# Altium PCB Telephone Circuit v1.0.PcbDoc (part 2 of 5)
Units mil, origin at the board's own origin, x right, y up, seen from the top; angles counter-clockwise.
Board outline 3149.61 x 2952.76 mil, 2 copper layers (Top Layer, Bottom Layer), stack 61.855 mil thick; 194 components, 119 nets, 557 pads, 213 vias.
Unrouted connection lines stored in the file: 77.
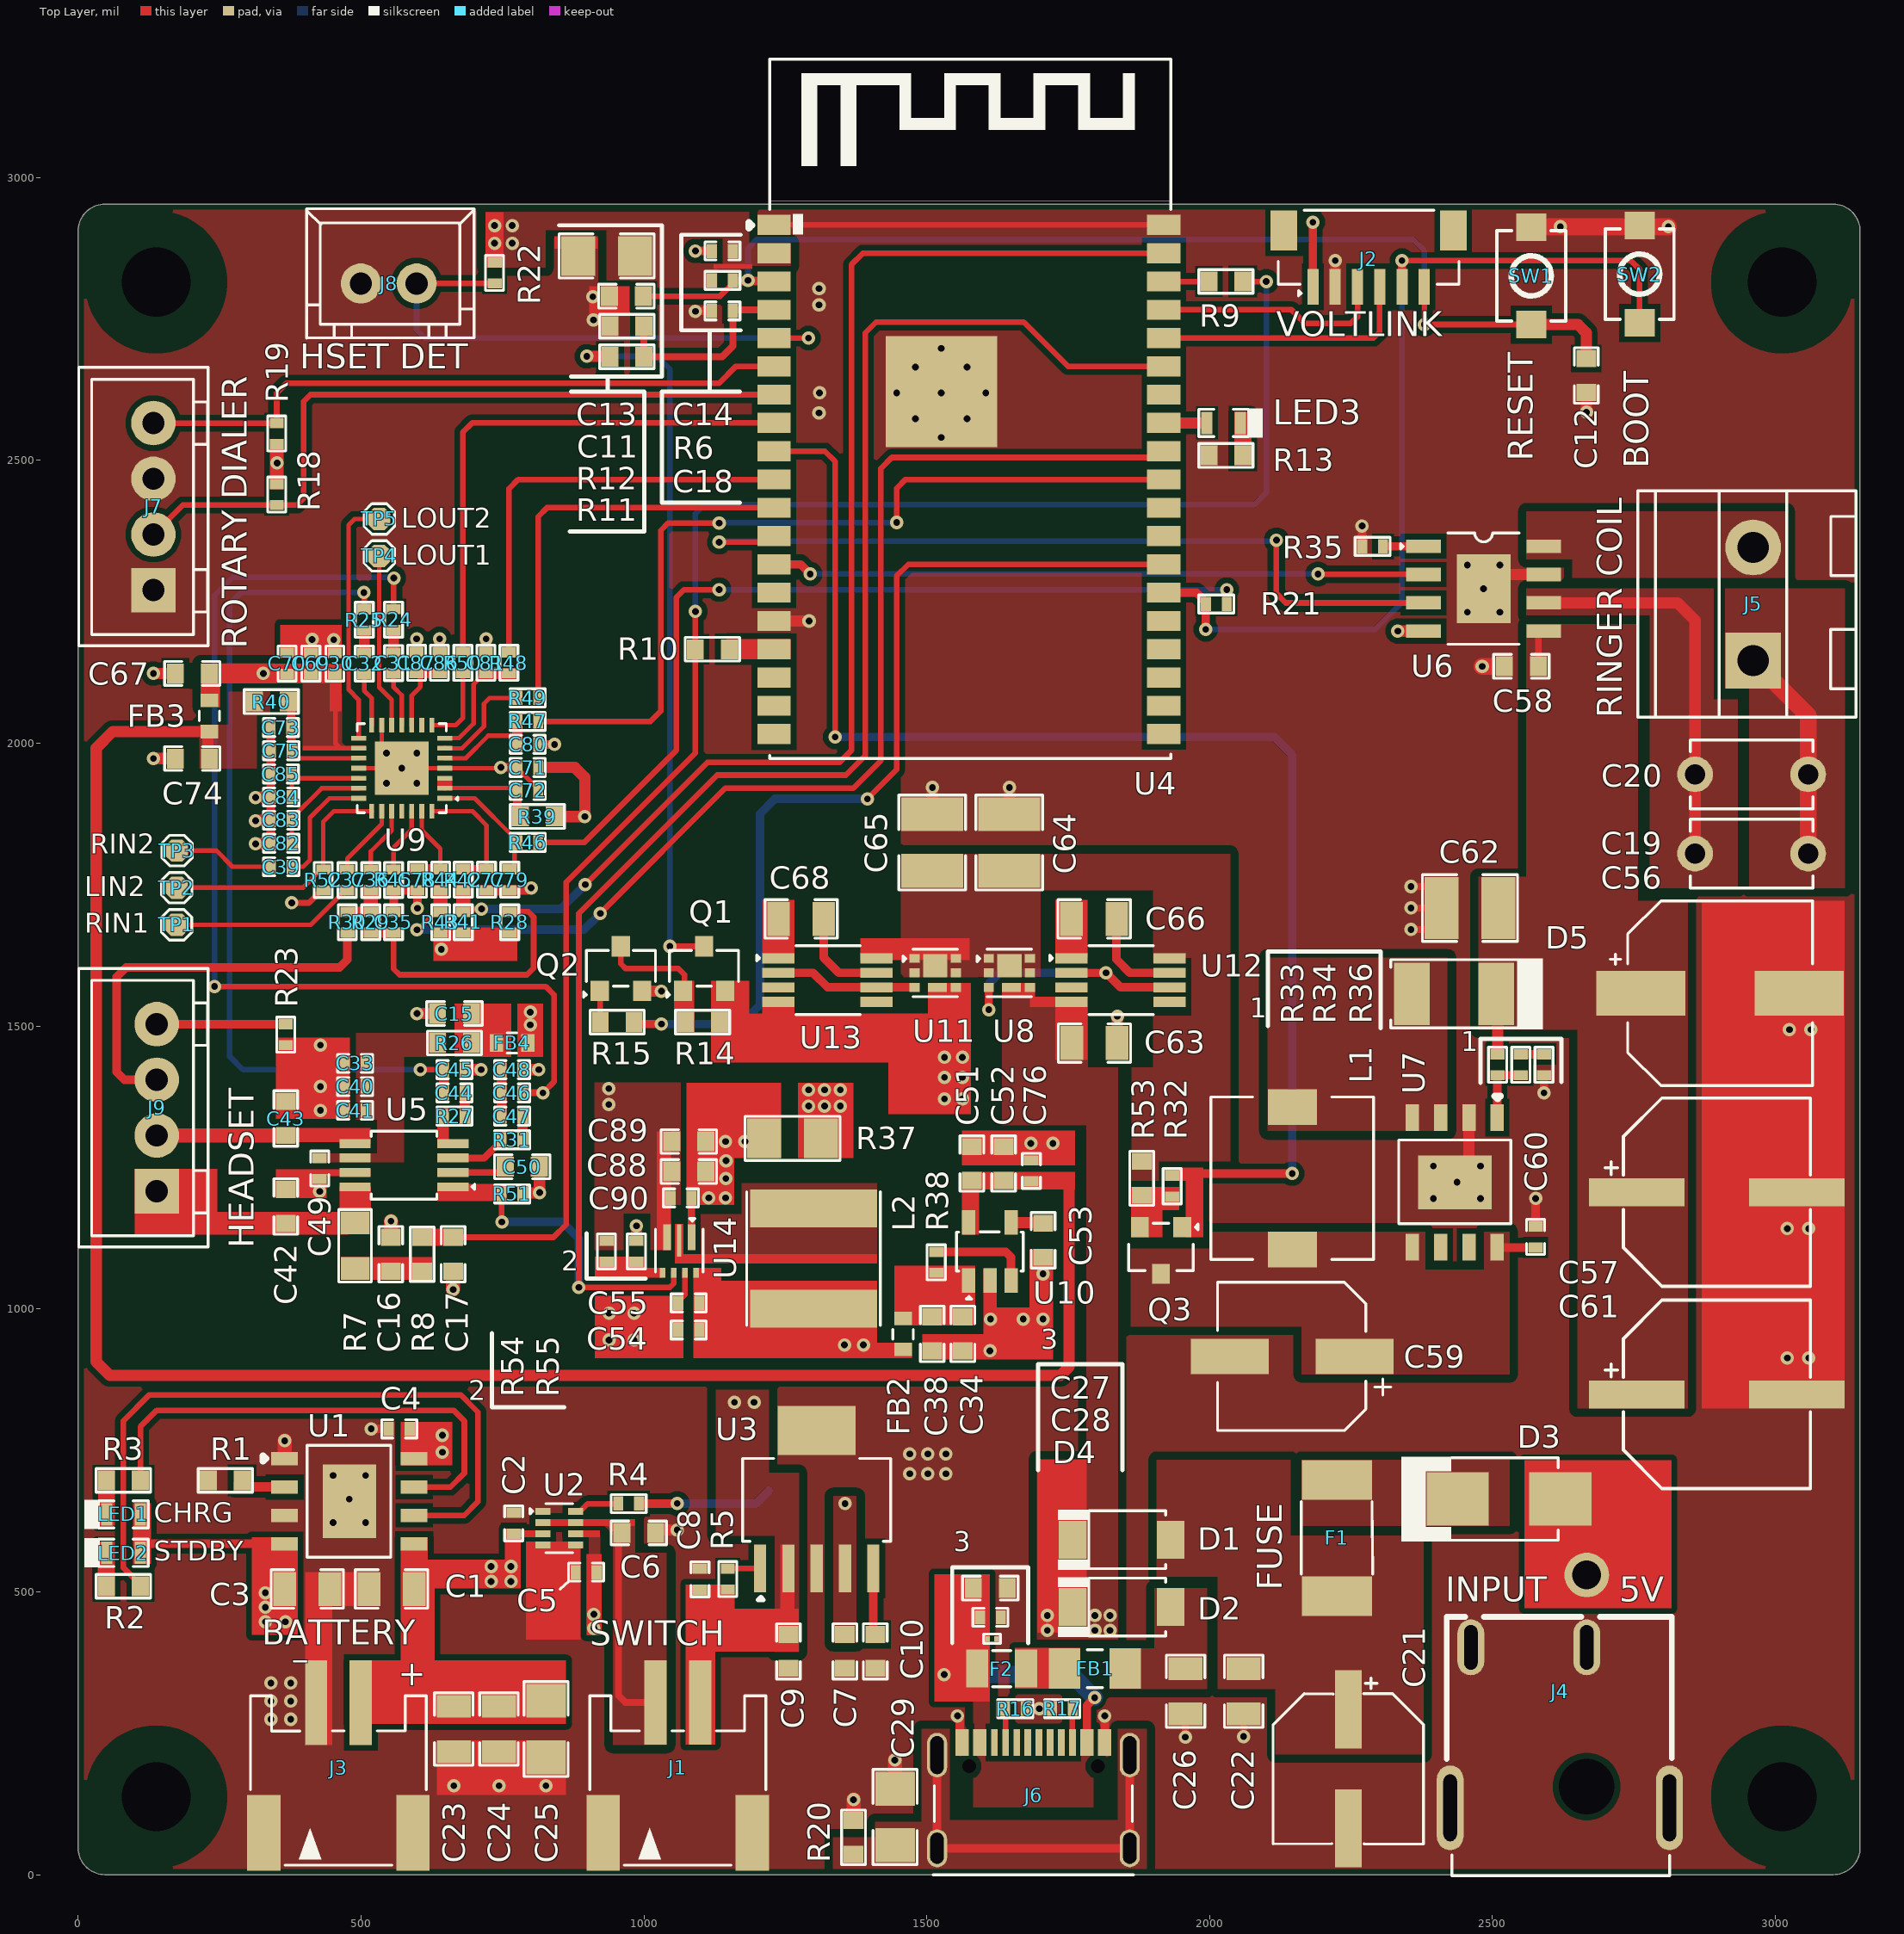
[diagram p0: Top Layer view]

## Part data (continued)
C38 C52: library part CL10A106MA8NRNC, "CAP CER 10UF 25V X5R 0603", Case Code (Imperial)=0603, Case Code (Metric)=1608, Dielectric=X5R, LCSC Part Number=C96446, Manufacturer=Samsung, Max Operating Temperature=85°C, Min Operating Temperature=-55°C, Package Quantity=1, Tolerance=20%, Voltage Rating=25V, Capacitance=10uF, Case/Package=0603, Category="Ceramic Capacitors", ComponentLink1Description=https://datasheet.ciiva.com/25766/cl10a106ma8nrnc-25766562.pdf?src-supplier=Digi-Key, ComponentLink1URL=https://datasheet.ciiva.com/25766/cl10a106ma8nrnc-25766562.pdf?src-supplier=Digi-Key, Construction=Flat, Contact Plating=Tin, Lead Free="Lead Free", Length=0.063inch, Manufacturer Part Number=CL10A106MA8NRNC, Mount="Surface Mount", Packaging="Tape and Reel", Pricing 1="4000=0.03753, 8000=0.03700, 16000=0.03595, 24000=0.03515, 32000=0.03383, 40000=0.03304, 400000=0.03225 (USD)", RoHS=Yes, RoHS Compliant=Yes, Series=CL, Supplier 1=Avnet, Supplier Part Number 1=CL10A106MA8NRNC, Termination=Wraparound, Thickness=0.035inch, Width=0.031inch
C42 C43: library part CC0603JRNPO9BN331, "CAP CER 330PF 50V C0G/NPO 0603", Capacitor Type=Ceramic, Case/Package=0603, LCSC Part Number=C62784, Manufacturer=Yageo, Max Operating Temperature=125°C, Min Operating Temperature=-55°C, Package Shape=Rectangular, Package Style=SMTMeter, Rated DC Voltage (URdc)=50V, Supplier Part Number 1=8843708, Temperature Characteristics Code=C0G, Tolerance  (fill in as +-)=5%, Category="Ceramic Capacitors", ComponentLink1Description=https://datasheet.ciiva.com:443/pdfs/VipMasterIC/IC/YAGO/YAGO-S-A0009251638/YAGO-S-A0009251638-1.pdf?src-supplier=IHS+Markit, ComponentLink1URL=https://datasheet.ciiva.com:443/pdfs/VipMasterIC/IC/YAGO/YAGO-S-A0009251638/YAGO-S-A0009251638-1.pdf?src-supplier=IHS+Markit, ComponentLink2Description=https://datasheet.ciiva.com/28450/1443161-28450501.pdf?src-supplier=Element14, ComponentLink2URL=https://datasheet.ciiva.com/28450/1443161-28450501.pdf?src-supplier=Element14, ComponentLink3Description=https://datasheet.ciiva.com/144/mlccorderingcode-144957.pdf?src-supplier=Digi-Key, ComponentLink3URL=https://datasheet.ciiva.com/144/mlccorderingcode-144957.pdf?src-supplier=Digi-Key, ComponentLink4Description=https://datasheet.ciiva.com/144/mlccorderingcode-144956.pdf?src-supplier=Digi-Key, ComponentLink4URL=https://datasheet.ciiva.com/144/mlccorderingcode-144956.pdf?src-supplier=Digi-Key, ComponentLink5Description=https://datasheet.ciiva.com/144/mlccorderingcode-144958.pdf?src-supplier=Digi-Key, ComponentLink5URL=https://datasheet.ciiva.com/144/mlccorderingcode-144958.pdf?src-supplier=Digi-Key, ComponentLink6Description=https://datasheet.ciiva.com/8033/1443161-8033739.pdf?src-supplier=Element14, ComponentLink6URL=https://datasheet.ciiva.com/8033/1443161-8033739.pdf?src-supplier=Element14, ComponentLink7Description=https://datasheet.ciiva.com/8033/1443161-8033737.pdf?src-supplier=Element14, ComponentLink7URL=https://datasheet.ciiva.com/8033/1443161-8033737.pdf?src-supplier=Element14, ComponentLink8Description=https://datasheet.ciiva.com/13389/upy-gp-np0-16v-to-50v-8-13389983.pdf?src-supplier=Mouser, ComponentLink8URL=https://datasheet.ciiva.com/13389/upy-gp-np0-16v-to-50v-8-13389983.pdf?src-supplier=Mouser, ComponentLink9Description=https://datasheet.ciiva.com/11587/upy-gp-np0-16v-to-50v-8-11587326.pdf?src-supplier=Avnet, ComponentLink9URL=https://datasheet.ciiva.com/11587/upy-gp-np0-16v-to-50v-8-11587326.pdf?src-supplier=Avnet, ComponentLink10Description=https://datasheet.ciiva.com/26829/getdatasheetpartid-403533-26829382.pdf?src-supplier=Verical, ComponentLink10URL=https://datasheet.ciiva.com/26829/getdatasheetpartid-403533-26829382.pdf?src-supplier=Verical, Dielectric Material=Ceramic, Height=0.8mm, Item Type=Capacitor, JESD-609 Code=e3, Length=1.6mm, Manufacturer Part Number=CC0603JRNPO9BN331, Mounting Technology="Surface Mount", Multilayer=Yes, Packaging="Tape and Reel", Pins=2, Pricing 1="4000=0.00990, 16000=0.00940, 20000=0.00980, 40000=0.00910, 80000=0.00930, 100000=0.00880, 160000=0.00830, 200000=0.00900, 500000=0.00850 (USD)", Reach SVHC Compliant=Yes, RoHS=Yes, RoHS Compliant=Yes, Stock 1=40000, Supplier 1="Future Electronics", Terminal Finish=Nickel, Termination=Wraparound, Tolerance (fill in as +-)=5%, Width=0.8mm
C45 C48: library part CC0402FRNPO9BN390, "CAP CER 39PF 50V C0G/NPO 0402", LCSC Part Number=C327068, Manufacturer=Yageo, Supplier Part Number=7829161, Category="Ceramic Capacitors", ComponentLink1Description=https://datasheet.ciiva.com/26936/getdatasheetpartid-403444-26936051.pdf?src-supplier=Verical, ComponentLink1URL=https://datasheet.ciiva.com/26936/getdatasheetpartid-403444-26936051.pdf?src-supplier=Verical, ComponentLink2Description=https://datasheet.ciiva.com/11587/upy-gp-np0-16v-to-50v-8-11587062.pdf?src-supplier=Avnet, ComponentLink2URL=https://datasheet.ciiva.com/11587/upy-gp-np0-16v-to-50v-8-11587062.pdf?src-supplier=Avnet, Item Type=Capacitor, Manufacturer Part Number=CC0402FRNPO9BN390, Pricing="10000=0.0077, 30000=0.0074, 50000=0.0072, 150000=0.0069, 250000=0.0067 (USD)", RoHS=Yes, Stock=40000, Supplier="Future Electronics"
C53: library part FN18X223K250PSG, "25V 22nF X7R 0603 Multilayer Ceramic Capacitors MLCC - SMD/SMT ROHS", LCSC Part no=C2929161, Package=0603, ComponentLink1Description=LCSC, ComponentLink1URL=https://www.lcsc.com/product-detail/Multilayer-Ceramic-Capacitors-MLCC-SMD-SMT_PSA-Prosperity-Dielectrics-FN18X223K250PSG_C2929161.html, Item Type=Capacitor, Manfacuturer=PSA, Manufacturer Prt no=FN18X223K250PSG
C56: library part EEE-FN1K470UP, "CAP ALUM 47UF 20% 80V SMD", Case/Package=Radial, ESR (Equivalent Series Resistance)=1.3R, LCSC Part Number=C494871, Leakage Current=37.6uA, Manufacturer=Panasonic, Max Operating Temperature=105°C, Min Operating Temperature=-55°C, Ripple Current=130mA, Tolerance=20%, Voltage Rating=80V, Dissipation Factor=8%, Height=10.5mm, Item Type=Capacitors, Life (Hours)=2000Hour, Manufacturer Part Number=EEE-FN1K470UP, Pricing="1=0.81, 10=0.516, 50=0.516, 100=0.413, 1000=0.296, 10000=0.249 (USD)", RoHS=No, Stock=4971, Supplier=Mouser
C57 C61: library part VKMD1451K101MV, "100uF 80V 735mA@100kHz ±20% SMD,D8xL14.5mm Aluminum Electrolytic Capacitors - SMD ROHS", LCSC Part Number=C487409, Manufacturer=Ymin, Package=SMD,D8xL14.5mm, ComponentLink1Description=LCSC, ComponentLink1URL=https://www.lcsc.com/product-detail/Aluminum-Electrolytic-Capacitors-SMD_Ymin-VKMD1451K101MV_C487409.html, Item Type=Capacitor, Manufacturer Part Number=VKMD1451K101MV
C58: library part CC0603ZRY5V9BB104, "CAP CER 0.1UF 50V Y5V 0603", Capacitance=100nF, Case Code (Imperial)=0603, Case Code (Metric)=1608, Dielectric=Y5V, LCSC Part Number=C106221, Manufacturer=Yageo, Max Operating Temperature=85°C, Min Operating Temperature=-30°C, Package Quantity=1, Supplier Part Number 1=311-1343-1-ND, Tolerance=80%, Voltage=50V, Case/Package=0603, ComponentLink1Description=http://www.yageo.com/documents/recent/UPY-GPHC_Y5V_6.3V-to-50V_8.pdf?src-supplier=Digi-Key, ComponentLink1URL=http://www.yageo.com/documents/recent/UPY-GPHC_Y5V_6.3V-to-50V_8.pdf?src-supplier=Digi-Key, ComponentLink2Description=http://www.yageo.com/documents/recent/UPY-GPHC_Y5V_6.3V-to-50V_5.pdf?src-supplier=Avnet+Europe, ComponentLink2URL=http://www.yageo.com/documents/recent/UPY-GPHC_Y5V_6.3V-to-50V_5.pdf?src-supplier=Avnet+Europe, ComponentLink3Description=https://www.verical.com/server-webapp/html/getDatasheet?partID=403611&src-supplier=Verical, ComponentLink3URL=https://www.verical.com/server-webapp/html/getDatasheet?partID=403611&src-supplier=Verical, ComponentLink4Description=http://www.mouser.com/ds/2/447/Yageo_UPY-GP_NP0_16V-to-50V_9-358835.pdf?src-supplier=Mouser, ComponentLink4URL=http://www.mouser.com/ds/2/447/Yageo_UPY-GP_NP0_16V-to-50V_9-358835.pdf?src-supplier=Mouser, ComponentLink5Description=http://www.farnell.com/datasheets/1132289.pdf?src-supplier=Element14, ComponentLink5URL=http://www.farnell.com/datasheets/1132289.pdf?src-supplier=Element14, Composition=Ceramic, Depth=0.8mm, Halogen Free="Halogen Free", Height=0.8mm, Item Type=Capacitor, Lead Free="Lead Free", Length=1.6mm, Manufacturer Part Number=CC0603ZRY5V9BB104, Mount="Surface Mount", Number of Pins=2, Packaging="Tape and Reel", Pricing 1="1=0.1, 10=0.075, 100=0.0334, 500=0.02386, 1000=0.01874 (USD)", Radiation Hardening=No, REACH SVHC="No SVHC", Stock 1=15000880, Supplier 1=Digi-Key, Termination=SMD/SMT, Thickness=0.035inch, Voltage Rating=50V, Voltage Rating (DC)=50V, Width=0.031inch
C59: library part GVT1C331M0607, "330uF 16V ±20% SMD,D6.3xL7.7mm Aluminum Electrolytic Capacitors - SMD ROHS", LCSC Part Number=C2980164, Manufacturer="Honor Elec", Package=SMD,D6.3xL7.7mm, ComponentLink1Description=LCSC, ComponentLink1URL=https://www.lcsc.com/product-detail/Aluminum-Electrolytic-Capacitors-SMD_Honor-Elec-GVT1C331M0607_C2980164.html, Item Type=Capacitor, Manufacturer Part Number=GVT1C331M0607
C60: library part CC0402KRX5R6BB475, "CAP CER 4.7UF 10V X5R 0402", Case Code (Imperial)=0402, Case Code (Metric)=1005, LCSC Part Number=C326586, Manufacturer=Yageo, Max Operating Temperature=85°C, Min Operating Temperature=-55°C, Supplier Part Number 1=3871698, Tolerance=10%, Voltage Rating=10V, Capacitance=4.7uF, Case/Package=0402, Category="Ceramic Capacitors", ComponentLink1Description=http://www.yageo.com/documents/recent/UPY-GPHC_X5R_4V-to-50V_25.pdf?src-supplier=Digi-Key, ComponentLink1URL=http://www.yageo.com/documents/recent/UPY-GPHC_X5R_4V-to-50V_25.pdf?src-supplier=Digi-Key, Manufacturer Part Number=CC0402KRX5R6BB475, Mount="Surface Mount", Packaging="Cut Tape", Pricing 1="10000=0.02310, 50000=0.02100 (GBP)", RoHS=Yes, RoHS Compliant=Yes, Stock 1=20000, Supplier 1=Farnell
C62 C64 C65: library part GRM32ER71J106KA12L, "CAP CER 10UF 63V X7R 1210", LCSC Part Number=C437568, Manufacturer=Murata, Package=1210, ComponentLink1Description=http://www.mouser.com/ds/2/281/c02e-2905.pdf?src-supplier=Mouser, ComponentLink1URL=http://www.mouser.com/ds/2/281/c02e-2905.pdf?src-supplier=Mouser, ComponentLink2Description=http://www.farnell.com/datasheets/2079202.pdf?src-supplier=Farnell, ComponentLink2URL=http://www.farnell.com/datasheets/2079202.pdf?src-supplier=Farnell, ComponentLink3Description=http://search.murata.co.jp/Ceramy/image/img/A01X/G101/ENG/GRM32ER71J106KA12-01.pdf?src-supplier=Digi-Key, ComponentLink3URL=http://search.murata.co.jp/Ceramy/image/img/A01X/G101/ENG/GRM32ER71J106KA12-01.pdf?src-supplier=Digi-Key, ComponentLink4Description=https://datasheet.octopart.com/GRM32ER71J106KA12L-Murata-datasheet-22122223.pdf?src-supplier=Future+Electronics, ComponentLink4URL=https://datasheet.octopart.com/GRM32ER71J106KA12L-Murata-datasheet-22122223.pdf?src-supplier=Future+Electronics, ComponentLink5Description=http://psearch.en.murata.com/capacitor/product/GRM32ER71J106KA12%23.pdf?src-supplier=Avnet, ComponentLink5URL=http://psearch.en.murata.com/capacitor/product/GRM32ER71J106KA12%23.pdf?src-supplier=Avnet, ComponentLink6Description=http://www.farnell.com/datasheets/2079202.pdf?src-supplier=Newark, ComponentLink6URL=http://www.farnell.com/datasheets/2079202.pdf?src-supplier=Newark, ComponentLink7Description=http://www.farnell.com/datasheets/2079202.pdf?src-supplier=Element14, ComponentLink7URL=http://www.farnell.com/datasheets/2079202.pdf?src-supplier=Element14, ComponentLink8Description=LCSC, ComponentLink8URL=https://www.lcsc.com/product-detail/Multilayer-Ceramic-Capacitors-MLCC-SMD-SMT_Murata-Electronics-GRM32ER71J106KA12L_C437568.html, Item Type=Capacitor, Manufacturer Part Number=GRM32ER71J106KA12L, Pricing="1000=0.3451, 2000=0.33698, 4000=0.32886, 6000=0.32074, 8000=0.31262 (USD)", RoHS=Yes, Stock=55000, Supplier=Avnet, Supplier Part Number=GRM32ER71J106KA12L
C63: library part CC0805KRX7R9BB101, "CAP CER 100PF 50V X7R 0805", LCSC Part Number=C107140, Manufacturer=Yageo, Supplier Part Number=3327608, Category="Ceramic Capacitors", ComponentLink1Description=https://datasheet.ciiva.com/11465/upy-gphc-x7r-6-3v-to-50v-8-11465306.pdf?src-supplier=Avnet, ComponentLink1URL=https://datasheet.ciiva.com/11465/upy-gphc-x7r-6-3v-to-50v-8-11465306.pdf?src-supplier=Avnet, Item Type=Capacitor, Manufacturer Part Number=CC0805KRX7R9BB101, Pricing="4000=0.0077, 16000=0.0073, 60000=0.007, 100000=0.0068, 200000=0.0065 (USD)", RoHS=Yes, Stock=516000, Supplier="Future Electronics"
C66 C68: library part C2012X5R1H225K125AB, "CAP CER 2.2UF 50V X5R 0805", Dielectric Material=4241ConductorMaterial, Manufacturer=TDK, Category="Ceramic Capacitors", ComponentLink1Description=https://datasheet.ciiva.com/24216/c2012x5r1h225k125ab-264892-24216756.pdf?src-supplier=Mouser, ComponentLink1URL=https://datasheet.ciiva.com/24216/c2012x5r1h225k125ab-264892-24216756.pdf?src-supplier=Mouser, ComponentLink2Description=https://datasheet.ciiva.com/6287/tdkmlcccaprange-6287487.pdf?src-supplier=Digikey, ComponentLink2URL=https://datasheet.ciiva.com/6287/tdkmlcccaprange-6287487.pdf?src-supplier=Digikey, ComponentLink3Description=https://datasheet.ciiva.com/6287/tdkmlcccaprange-6287494.pdf?src-supplier=Digikey, ComponentLink3URL=https://datasheet.ciiva.com/6287/tdkmlcccaprange-6287494.pdf?src-supplier=Digikey, ComponentLink4Description=https://datasheet.ciiva.com/6287/tdkmlcccaprange-6287500.pdf?src-supplier=Digikey, ComponentLink4URL=https://datasheet.ciiva.com/6287/tdkmlcccaprange-6287500.pdf?src-supplier=Digikey, ComponentLink5Description=https://datasheet.ciiva.com/28451/1796654-28451710.pdf?src-supplier=Element14, ComponentLink5URL=https://datasheet.ciiva.com/28451/1796654-28451710.pdf?src-supplier=Element14, ComponentLink6Description=https://datasheet.ciiva.com/22725/1913358-22725562.pdf?src-supplier=Element14, ComponentLink6URL=https://datasheet.ciiva.com/22725/1913358-22725562.pdf?src-supplier=Element14, Item Type=Capacitor, Lead Free=5697LeadFree, Manufacturer Part Number=C2012X5R1H225K125AB, Material=4241ConductorMaterial, Pricing="2000=0.08532 (USD)", RoHS=Yes, Stock=6000, Supplier=Avnet, Supplier Part Number=C2012X5R1H225K125AB
C67: library part CC0603KRX5R7BB475, "CAP CER 4.7UF 16V X5R 0603", Case Code (Imperial)=0603, Case Code (Metric)=1608, Dielectric=X5R, LCSC Part Number=C277476, Manufacturer=Yageo, Max Operating Temperature=85°C, Min Operating Temperature=-55°C, Resistor Type=Ceramic, Supplier Part Number 1=311-1785-1-ND, Tolerance=10%, Voltage Rating=16V, Capacitance=4.7uF, Case/Package=0603, Category="Ceramic Capacitors", ComponentLink1Description=http://www.mouser.com/ds/2/447/UPY-GPHC_X5R_4V-to-50V_25-1131599.pdf?src-supplier=Mouser, ComponentLink1URL=http://www.mouser.com/ds/2/447/UPY-GPHC_X5R_4V-to-50V_25-1131599.pdf?src-supplier=Mouser, ComponentLink2Description=http://www.yageo.com/documents/recent/UPY-GPHC_X5R_4V-to-50V_25.pdf?src-supplier=Digi-Key, ComponentLink2URL=http://www.yageo.com/documents/recent/UPY-GPHC_X5R_4V-to-50V_25.pdf?src-supplier=Digi-Key, Depth=0.8mm, Halogen Free="Halogen Free", Height=0.8mm, Item Type=Capacitor, Lead Free="Lead Free", Length=1.6mm, Manufacturer Part Number=CC0603KRX5R7BB475, Mount="Surface Mount", Packaging="Tape and Reel", Pricing 1="1=0.20000, 10=0.13800, 50=0.08280, 100=0.06990, 500=0.04784, 1000=0.04233 (USD)", RoHS=Yes, RoHS Compliant=Yes, Series=CC, Stock 1=547703, Supplier 1=Digi-Key, Termination=SMD/SMT, Thickness=0.037inch, Voltage Rating (DC)=16V, Weight=7.1E-05oz, Width=0.8mm
C77 C78 C79 C80 C81: library part CC0402JRNPO9BN200, "CAP CER 20PF 50V C0G/NPO 0402", LCSC Part Number=C107000, Manufacturer=Yageo, Temperature Coefficient=30ppm/°C, ComponentLink1Description=https://datasheet.ciiva.com/176/mlccorderingcode-176360.pdf?src-supplier=Digikey, ComponentLink1URL=https://datasheet.ciiva.com/176/mlccorderingcode-176360.pdf?src-supplier=Digikey, ComponentLink2Description=https://datasheet.ciiva.com/176/mlccorderingcode-176361.pdf?src-supplier=Digikey, ComponentLink2URL=https://datasheet.ciiva.com/176/mlccorderingcode-176361.pdf?src-supplier=Digikey, ComponentLink3Description=https://datasheet.ciiva.com/176/mlccorderingcode-176362.pdf?src-supplier=Digikey, ComponentLink3URL=https://datasheet.ciiva.com/176/mlccorderingcode-176362.pdf?src-supplier=Digikey, ComponentLink4Description=https://datasheet.ciiva.com/7656/1132289-7656614.pdf?src-supplier=Element14, ComponentLink4URL=https://datasheet.ciiva.com/7656/1132289-7656614.pdf?src-supplier=Element14, ComponentLink5Description=https://datasheet.ciiva.com/5427/upy-gp-np0-16v-to-50v-8-3714-5427769.pdf?src-supplier=Mouser, ComponentLink5URL=https://datasheet.ciiva.com/5427/upy-gp-np0-16v-to-50v-8-3714-5427769.pdf?src-supplier=Mouser, Halogen Free=5694HalogenFree, Item Type=Capacitor, Manufacturer Part Number=CC0402JRNPO9BN200, Pricing="10000=0.00221 (USD)", RoHS=Yes, Stock=20000, Supplier=Avnet
D1 D2: "DIODE SCHOTTKY 30V 3A SOD128", Average Rectified Current=3A, Forward Voltage=360mV, LCSC Part Number=C255587, Manufacturer=Nexperia, Max Forward Surge Current (Ifsm)=50A, Max Operating Temperature=150°C, Max Repetitive Reverse Voltage (Vrrm)=30V, Max Reverse Current=5mA, Min Operating Temperature=-55°C, Power Dissipation=625mW, ComponentLink1Description=http://www.farnell.com/datasheets/609322.pdf?src-supplier=Farnell, ComponentLink1URL=http://www.farnell.com/datasheets/609322.pdf?src-supplier=Farnell, ComponentLink2Description=https://assets.nexperia.com/documents/data-sheet/PMEG3030EP.pdf?src-supplier=Digikey, ComponentLink2URL=https://assets.nexperia.com/documents/data-sheet/PMEG3030EP.pdf?src-supplier=Digikey, ComponentLink3Description=https://datasheet.octopart.com/PMEG3030EP%2C115-Nexperia-datasheet-115885221.pdf?src-supplier=Newark, ComponentLink3URL=https://datasheet.octopart.com/PMEG3030EP%2C115-Nexperia-datasheet-115885221.pdf?src-supplier=Newark, Element Configuration=5460ElementConfiguration, Forward Current=3A, Height=1.1mm, Item Type=Diodes, Lead Free=5697LeadFree, Manufacturer Part Number=PMEG3030EP,115, Max Reverse Voltage (DC)=30V, Max Surge Current=50A, Mounting Technology=8Mount, Peak Non-Repetitive Surge Current=50A, Pins=2NUMBER, Pricing="3000=0.111, 6000=0.109, 9000=0.108, 15000=0.106 (USD)", Radiation Hardening=5898YesNo, Reverse Voltage=30V, RoHS=Yes, RoHS Compliant=Yes, Stock=279000, Supplier="Future Electronics"
D3: "SCHOTTKY DIODE SMB 100V 5A", LCSC Part Number=C3011128, Manufacturer=MDD, Package=SMB, ComponentLink1Description=LCSC, ComponentLink1URL=https://www.lcsc.com/product-detail/Schottky-Barrier-Diodes-SBD_JUXING-SS510B_C3011128.html, Item Type=Diode, Manufacturer Part Number=SS510B
D4: "TVS DIODE 5VWM 6.3VC DSN0603-2", LCSC Part Number=C477989, Manufacturer=Nexperia, Category="ESD and Circuit Protection ICs", ComponentLink1Description=http://www.farnell.com/datasheets/1961312.pdf?src-supplier=Farnell, ComponentLink1URL=http://www.farnell.com/datasheets/1961312.pdf?src-supplier=Farnell, ComponentLink2Description=https://assets.nexperia.com/documents/data-sheet/PESD5V0H1BSF.pdf?src-supplier=Digi-Key, ComponentLink2URL=https://assets.nexperia.com/documents/data-sheet/PESD5V0H1BSF.pdf?src-supplier=Digi-Key, ComponentLink3Description=http://www.farnell.com/datasheets/1961312.pdf?src-supplier=Newark, ComponentLink3URL=http://www.farnell.com/datasheets/1961312.pdf?src-supplier=Newark, Item Type=Diode, Manufacturer Part Number=PESD5V0H1BSFYL, Pricing 1="18000=0.06453, 36000=0.06278, 54000=0.06104, 90000=0.05930, 180000=0.05755, 900000=0.05581, 1800000=0.05406 (USD)", RoHS=Yes, RoHS Compliant=Yes, Stock 1=9000, Supplier 1=Avnet, Supplier Part Number 1=PESD5V0H1BSFYL
D5: "60V 700mV@2A 2A SMA(DO-214AC) Schottky Barrier Diodes (SBD) ROHS", LCSC Part Number=C14238, Manufacturer=MDD, Package=SMA(DO-214AC), ComponentLink1Description=LCSC, ComponentLink1URL=https://www.lcsc.com/product-detail/Schottky-Barrier-Diodes-SBD_MDD-Microdiode-Electronics-SS26_C14238.html, Item Type=Diode, Manufacturer Part Number=SS26
F1: "13.2V 2.6A 40A 800mW -40℃~+85℃ 5.2A 10mΩ 2.5s 50mΩ 1812 Resettable Fuses ROHS", LCSC Part Number=C883159, Manufacturer=BHFUSE, Volts=13.2V, Amps=2.6A-40A, ComponentLink1Description=LCSC, ComponentLink1URL=https://www.lcsc.com/product-detail/Resettable-Fuses_BHFUSE-BSMD1812-260-13-2V_C883159.html, Item=1812, Item Type=Fuse, Manufacturer Part Number=BSMD1812-260-13.2V, Watt=800mW
F2: "6V 2A 50A 1W -40℃~+85℃ 4A 4mΩ 5s 45mΩ 0805 Resettable Fuses ROHS", LCSC Part Number=C2757931, Manufacturer=BHFUSE, Package=0805, ComponentLink1Description=LCSC, ComponentLink1URL=https://www.lcsc.com/product-detail/Resettable-Fuses_BHFUSE-BSMD0805L-200_C2757931.html, Item Type=Fuse, Manufacturer Part Number=BSMD0805L-200
FB1: library part BLM31PG121SN1L, "FERRITE BEAD 120 OHM 1206 1LN", Case Code (Imperial)=1206, Case Code (Metric)=3216, Current Rating=3.5A, DC Current=3A, DC Resistance (DCR)=20mR, LCSC Part Number=C85841, Manufacturer=Murata, Max Operating Temperature=125°C, Min Operating Temperature=-55°C, Package Quantity=3000, Tolerance=25%, Case/Package=1206, Category="Ferrite Beads and Chips", ComponentLink1Description=https://datasheet.ciiva.com/19460/1845419-19460234.pdf?src-supplier=Jameco, ComponentLink1URL=https://datasheet.ciiva.com/19460/1845419-19460234.pdf?src-supplier=Jameco, ComponentLink2Description=https://datasheet.ciiva.com/1012/l0132s0193blm31p-1012992.pdf?src-supplier=Digi-Key, ComponentLink2URL=https://datasheet.ciiva.com/1012/l0132s0193blm31p-1012992.pdf?src-supplier=Digi-Key, ComponentLink3Description=https://datasheet.ciiva.com/11799/0900766b811b5866-11799444.pdf?src-supplier=RSComponents, ComponentLink3URL=https://datasheet.ciiva.com/11799/0900766b811b5866-11799444.pdf?src-supplier=RSComponents, ComponentLink4Description=https://datasheet.ciiva.com/3081/l0110s0100blm31p-3081665.pdf?src-supplier=Avnet, ComponentLink4URL=https://datasheet.ciiva.com/3081/l0110s0100blm31p-3081665.pdf?src-supplier=Avnet, ComponentLink5Description=https://datasheet.ciiva.com/41449/001172383-da-01-en-drossel-1206-120r-3-2x1-60mm-3000st-41449554.pdf?src-supplier=Conrad, ComponentLink5URL=https://datasheet.ciiva.com/41449/001172383-da-01-en-drossel-1206-120r-3-2x1-60mm-3000st-41449554.pdf?src-supplier=Conrad, ComponentLink6Description=https://datasheet.ciiva.com/29348/442557-da-01-en-chip-drossel-1206-120r-3000ma-3-2x1-60mm-29348014.pdf?src-supplier=Conrad, ComponentLink6URL=https://datasheet.ciiva.com/29348/442557-da-01-en-chip-drossel-1206-120r-3000ma-3-2x1-60mm-29348014.pdf?src-supplier=Conrad, ComponentLink7Description=https://datasheet.ciiva.com/14122/apblm31p-data-e-14122856.pdf?src-supplier=Distrelec, ComponentLink7URL=https://datasheet.ciiva.com/14122/apblm31p-data-e-14122856.pdf?src-supplier=Distrelec, ComponentLink8Description=https://datasheet.ciiva.com/48436/blm31pg121sn1l-eng-tds-48436731.pdf?src-supplier=Distrelec, ComponentLink8URL=https://datasheet.ciiva.com/48436/blm31pg121sn1l-eng-tds-48436731.pdf?src-supplier=Distrelec, ComponentLink9Description=https://datasheet.ciiva.com/1012/l0110s0100blm31p-1012991.pdf?src-supplier=Digi-Key, ComponentLink9URL=https://datasheet.ciiva.com/1012/l0110s0100blm31p-1012991.pdf?src-supplier=Digi-Key, ComponentLink10Description=https://datasheet.ciiva.com/1012/l0110s0100blm31p-1012993.pdf?src-supplier=Digi-Key, ComponentLink10URL=https://datasheet.ciiva.com/1012/l0110s0100blm31p-1012993.pdf?src-supplier=Digi-Key, ComponentLink11Description=https://datasheet.ciiva.com/3081/l0110s0100blm31p-3081666.pdf?src-supplier=Avnet, ComponentLink11URL=https://datasheet.ciiva.com/3081/l0110s0100blm31p-3081666.pdf?src-supplier=Avnet, ComponentLink12Description=https://datasheet.ciiva.com/16390/l0110s0100blm31p-16390857.pdf?src-supplier=Future+Electronics, ComponentLink12URL=https://datasheet.ciiva.com/16390/l0110s0100blm31p-16390857.pdf?src-supplier=Future+Electronics, ComponentLink13Description=https://datasheet.ciiva.com/18093/getdatasheetpartid-152966-18093084.pdf?src-supplier=Verical, ComponentLink13URL=https://datasheet.ciiva.com/18093/getdatasheetpartid-152966-18093084.pdf?src-supplier=Verical, Contact Plating=Tin,Matte, Core Material=Ferrite, Depth=1.6mm, Frequency=100MHz, Height=1.1mm, Impedance=120R, Item Type="Ferrite Bead", Lead Free="Lead Free", Length=3.2mm, Manufacturer Part Number=BLM31PG121SN1L, Material=Steel,Ferrite, Max Current Rating=3.5A, Max DC Current=3A, Military Standard=Not, Number of Lines=1, Number of Pins=2, Packaging="Tape and Reel", Pricing 1="3000=0.11563, 6000=0.10938, 12000=0.10313, 18000=0.09688, 24000=0.09063, 30000=0.08438, 300000=0.07813 (USD)", Radiation Hardening=No, RoHS=Yes, RoHS Compliant=Yes, Shielding=Unshielded, Stock 1=290640, Supplier 1=Avnet, Supplier Part Number 1=BLM31PG121SN1L, Termination=SMD/SMT, Test Frequency=100MHz, Width=1.6mm
FB2 FB3: "FERRITE BEAD 120 OHM 0603 1LN", Case Code (Imperial)=0603, Case Code (Metric)=1608, Current Rating=3A, DC Resistance (DCR)=25mR, Frequency=100MHz, LCSC Part Number=C113030, Manufacturer=Murata, Max Operating Temperature=125°C, Min Operating Temperature=-55°C, Package Quantity=1, Tolerance=25%, Case/Package=0603, Category="Ferrite Beads and Chips", ComponentLink1Description=https://datasheet.ciiva.com/1012/l0110s0100blm18s-1012624.pdf?src-supplier=Digi-Key, ComponentLink1URL=https://datasheet.ciiva.com/1012/l0110s0100blm18s-1012624.pdf?src-supplier=Digi-Key, ComponentLink2Description=https://datasheet.ciiva.com/11799/0900766b811b5866-11799181.pdf?src-supplier=RSComponents, ComponentLink2URL=https://datasheet.ciiva.com/11799/0900766b811b5866-11799181.pdf?src-supplier=RSComponents, ComponentLink3Description=https://datasheet.ciiva.com/18093/getdatasheetpartid-295885-18093249.pdf?src-supplier=Verical, ComponentLink3URL=https://datasheet.ciiva.com/18093/getdatasheetpartid-295885-18093249.pdf?src-supplier=Verical, ComponentLink4Description=https://datasheet.ciiva.com/41449/001171723-da-01-en-chip-drossel0603-120r-3000ma-1-6x0-8mm-41449353.pdf?src-supplier=Conrad, ComponentLink4URL=https://datasheet.ciiva.com/41449/001171723-da-01-en-chip-drossel0603-120r-3000ma-1-6x0-8mm-41449353.pdf?src-supplier=Conrad, ComponentLink5Description=https://datasheet.ciiva.com/41449/001172312-da-01-en-drossel-0603-120r-1-6x0-8mm-10000st-41449675.pdf?src-supplier=Conrad, ComponentLink5URL=https://datasheet.ciiva.com/41449/001172312-da-01-en-drossel-0603-120r-1-6x0-8mm-10000st-41449675.pdf?src-supplier=Conrad, ComponentLink6Description=https://datasheet.ciiva.com/8021/5151-8021511.pdf?src-supplier=Element14, ComponentLink6URL=https://datasheet.ciiva.com/8021/5151-8021511.pdf?src-supplier=Element14, ComponentLink7Description=https://datasheet.ciiva.com/8021/5151-8021512.pdf?src-supplier=Element14, ComponentLink7URL=https://datasheet.ciiva.com/8021/5151-8021512.pdf?src-supplier=Element14, ComponentLink8Description=https://datasheet.ciiva.com/14122/blm-series-eng-tds-14122906.pdf?src-supplier=Distrelec, ComponentLink8URL=https://datasheet.ciiva.com/14122/blm-series-eng-tds-14122906.pdf?src-supplier=Distrelec, ComponentLink9Description=https://datasheet.ciiva.com/1012/l0110s0100blm18s-1012623.pdf?src-supplier=Digi-Key, ComponentLink9URL=https://datasheet.ciiva.com/1012/l0110s0100blm18s-1012623.pdf?src-supplier=Digi-Key, ComponentLink10Description=https://datasheet.ciiva.com/1012/l0110s0100blm18s-1012625.pdf?src-supplier=Digi-Key, ComponentLink10URL=https://datasheet.ciiva.com/1012/l0110s0100blm18s-1012625.pdf?src-supplier=Digi-Key, ComponentLink11Description=https://datasheet.ciiva.com/16395/l0110s0100blm18s-16395498.pdf?src-supplier=Future+Electronics, ComponentLink11URL=https://datasheet.ciiva.com/16395/l0110s0100blm18s-16395498.pdf?src-supplier=Future+Electronics, Core Material=Ferrite, DC Resistance-Max=25mR, Depth=0.8mm, Height=0.8mm, Impedance=120R, Item Type="Ferrite Bead", Lead Free="Lead Free", Length=1.6mm, Manufacturer Part Number=BLM18SG121TN1D, Material=Steel,Ferrite, Max Current Rating=3A, Max DC Current=3A, Number of Circuits=1, Number of Lines=1, Number of Pins=2, Packaging="Tape and Reel", Pricing 1="1=0.12640, 10=0.08350, 25=0.07210, 100=0.05150, 250=0.04730, 500=0.04110, 1000=0.03420, 3000=0.03360, 6000=0.03320, 15000=0.03270, 30000=0.03200, 75000=0.03150 (USD)", Reach SVHC Compliant=Yes, RoHS=Yes, RoHS Compliant=Yes, Series=BLM18S, Shielding=Unshielded, Stock 1=82612, Supplier 1="Arrow Electronics", Supplier Part Number 1=BLM18SG121TN1D, Termination=SMD/SMT, Test Frequency=100MHz, Width=0.8mm
FB4: "0603 180Ω ±25% DCR=0.09Ω 1.5A", Case Code (Imperial)=0603, Case Code (Metric)=1608, Current Rating=1.5A, DC Resistance (DCR)=90mR, LCSC Part Number=C82850, Manufacturer=Murata, Manufacturer Series=BLM18P, Max Operating Temperature=125°C, Min Operating Temperature=-55°C, Package Quantity=1, Test Frequency=100MHz, Tolerance=25%, Case/Package=0603, Category=Inductors, ComponentLink1Description=https://datasheet.ciiva.com/36526/1845021-36526048.pdf?src-supplier=Jameco, ComponentLink1URL=https://datasheet.ciiva.com/36526/1845021-36526048.pdf?src-supplier=Jameco, ComponentLink2Description=https://datasheet.ciiva.com/11800/0900766b81275ca5-11800854.pdf?src-supplier=RSComponents, ComponentLink2URL=https://datasheet.ciiva.com/11800/0900766b81275ca5-11800854.pdf?src-supplier=RSComponents, ComponentLink3Description=https://datasheet.ciiva.com/29347/442378-da-01-en-chip-drossel-0603-180r-1500ma-1-6x0-8mm-29347913.pdf?src-supplier=Conrad, ComponentLink3URL=https://datasheet.ciiva.com/29347/442378-da-01-en-chip-drossel-0603-180r-1500ma-1-6x0-8mm-29347913.pdf?src-supplier=Conrad, ComponentLink4Description=https://datasheet.ciiva.com/8021/5148-8021478.pdf?src-supplier=Element14, ComponentLink4URL=https://datasheet.ciiva.com/8021/5148-8021478.pdf?src-supplier=Element14, ComponentLink5Description=https://datasheet.ciiva.com/8021/5148-8021496.pdf?src-supplier=Element14, ComponentLink5URL=https://datasheet.ciiva.com/8021/5148-8021496.pdf?src-supplier=Element14, ComponentLink6Description=https://datasheet.ciiva.com/1012/l0110s0100blm18p-1012153.pdf?src-supplier=Digi-Key, ComponentLink6URL=https://datasheet.ciiva.com/1012/l0110s0100blm18p-1012153.pdf?src-supplier=Digi-Key, ComponentLink7Description=https://datasheet.ciiva.com/1012/l0110s0100blm18p-1012152.pdf?src-supplier=Digi-Key, ComponentLink7URL=https://datasheet.ciiva.com/1012/l0110s0100blm18p-1012152.pdf?src-supplier=Digi-Key, ComponentLink8Description=https://datasheet.ciiva.com/1012/l0110s0100blm18p-1012154.pdf?src-supplier=Digi-Key, ComponentLink8URL=https://datasheet.ciiva.com/1012/l0110s0100blm18p-1012154.pdf?src-supplier=Digi-Key, ComponentLink9Description=https://datasheet.ciiva.com/8084/l0110s0100blm18p-8084296.pdf?src-supplier=Avnet, ComponentLink9URL=https://datasheet.ciiva.com/8084/l0110s0100blm18p-8084296.pdf?src-supplier=Avnet, ComponentLink10Description=https://datasheet.ciiva.com/16394/l0110s0100blm18p-16394029.pdf?src-supplier=Future+Electronics, ComponentLink10URL=https://datasheet.ciiva.com/16394/l0110s0100blm18p-16394029.pdf?src-supplier=Future+Electronics, Core Material=Ferrite, DC Current=1.5A, DC Resistance-Max=90mR, Depth=0.8mm, Height=0.8mm, Impedance=180R, Item Type="Ferrite Bead", Lead Free="Lead Free", Length=1.6mm, Manufacturer Part Number=BLM18PG181SN1D, Material=Ferrite,Steel, Max Current Rating=1.5A, Max DC Current=1.5A, Number of Circuits=1, Number of Functions=1, Number of Lines=1, Number of Pins=2, Packaging="Tape and Reel", Pricing 1="1=0.08740, 10=0.06280 (USD)", Radiation Hardening=No, REACH SVHC="No SVHC", RoHS=Yes, RoHS Compliant=Yes, Series=BLM18P, Shielding=Unshielded, Stock 1=13, Supplier 1="Arrow Electronics", Supplier Part Number 1=BLM18PG181SN1D, Terminal Finish=Tin, Termination=SMD/SMT, Width=0.8mm